# Altium PCB x-fly_v0.11a.PcbDoc (part 2 of 2)
Units mil, origin at the board's own origin, x right, y up, seen from the top; angles counter-clockwise.
Board outline 1417.32 x 1417.32 mil, 4 copper layers (L1_TOP, L2_GND, L3_POWER, L4_BOTTOM), stack 21.665 mil thick; 122 components, 92 nets, 493 pads, 97 vias.
Unrouted connection lines stored in the file: 100.
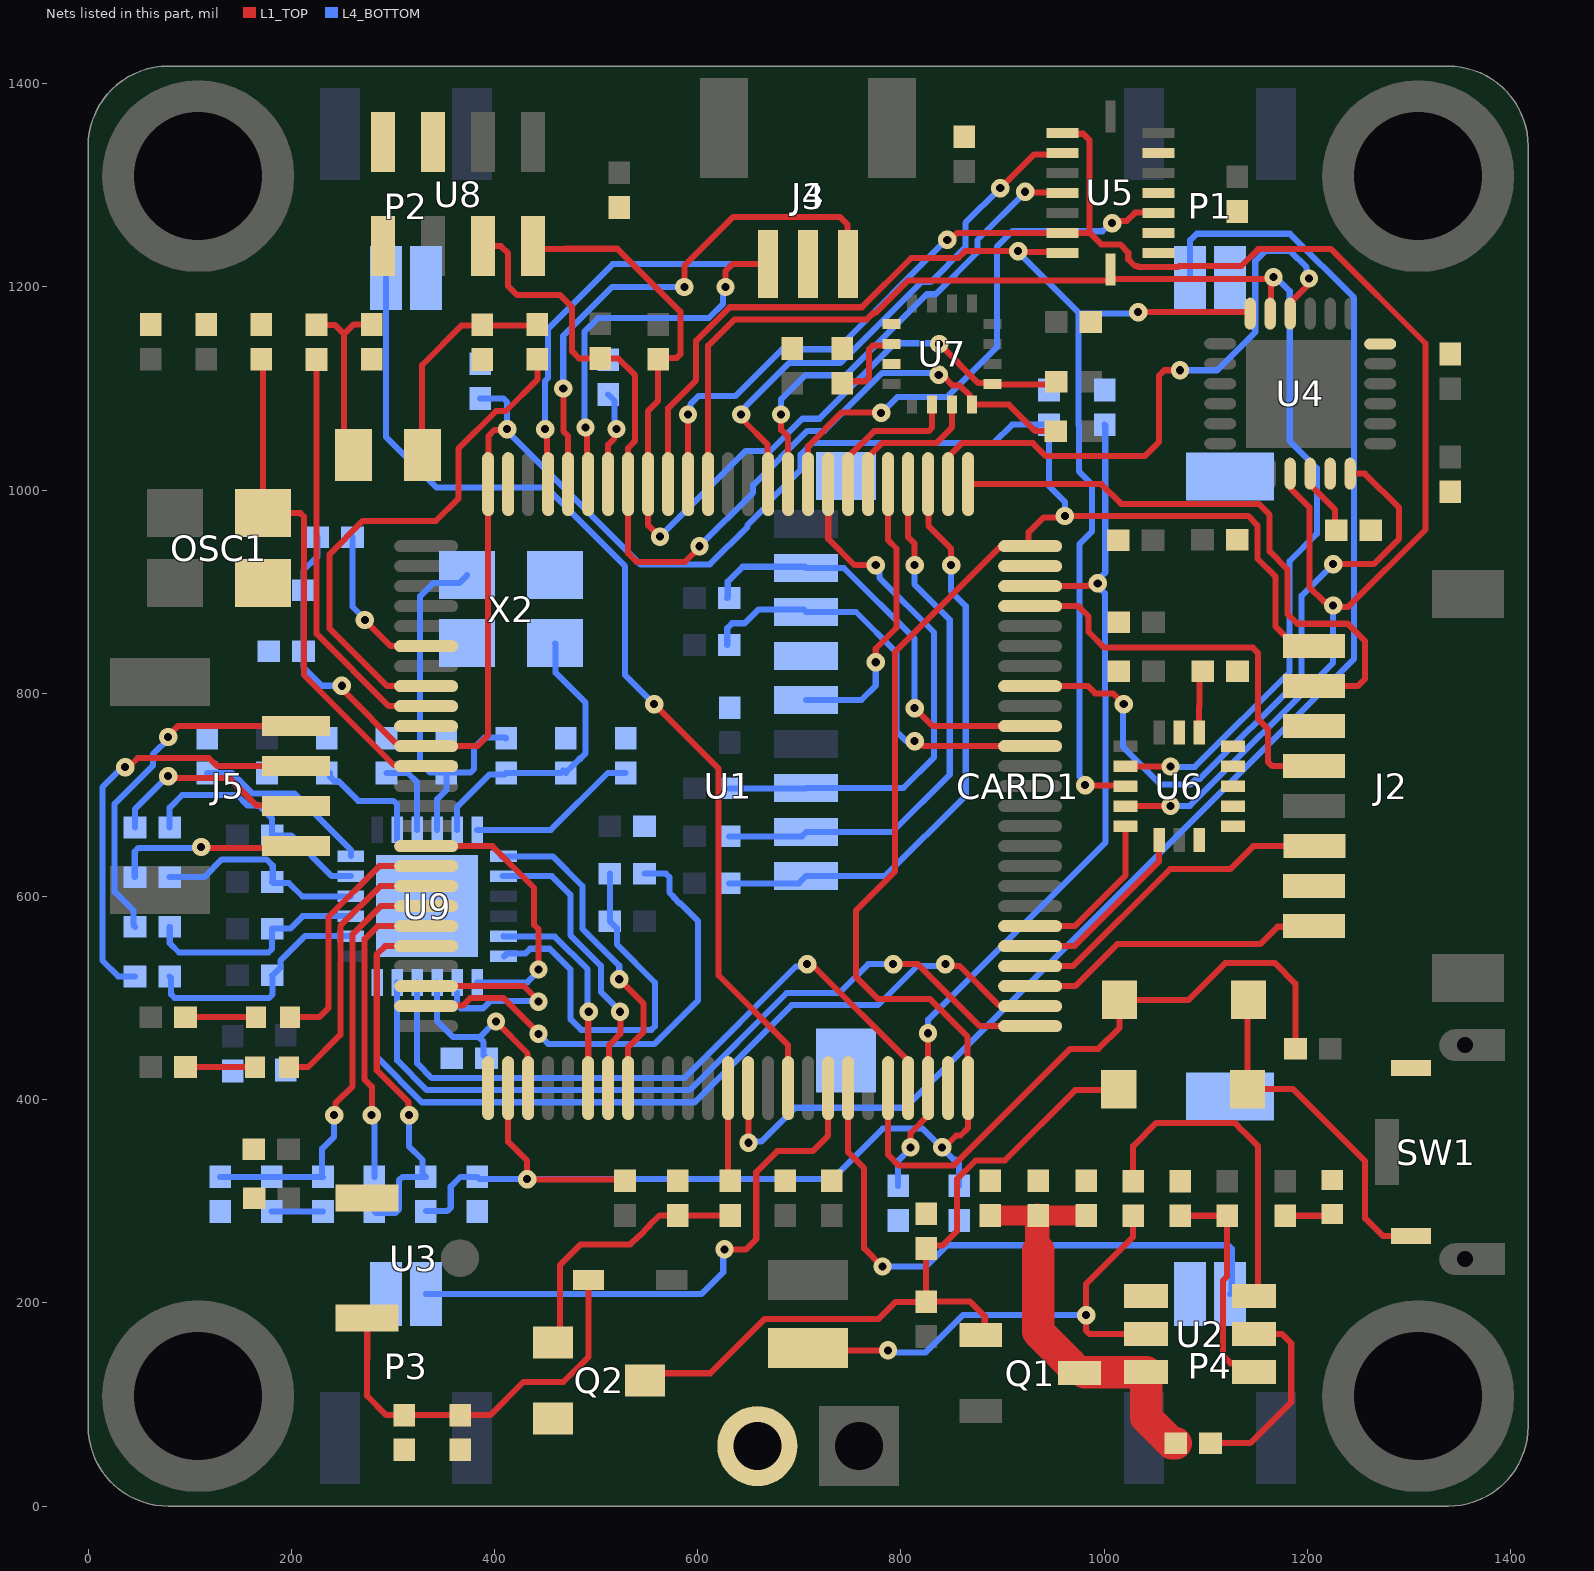
[diagram p4: the nets of this part, all layers, seen from the top]

## Via types
v1: diameter 18, hole 8, L1_TOP to L4_BOTTOM, tented both sides, 97 vias

## Nets (pads, with @x,y where several pads share a name; then routed paths per layer and width w, separated by ;. In a path a pad name is that pad's centre, name@x,y a point inside that pad or via, vN(x,y) a via of type N, cw(c..) or ccw(c..) an arc to the next point about the centre after c; other vN are vias at no path point) (continued)
BMI088_GYRO_INT: U1.85 U5.12 | length 455.9
  L1_TOP w6: v1(681.97,1074.59) 681.97,1059.4 688.98,1052.39 U1.85@688.98,1005.9 ; v1(922.24,1293.77) 922.85,1293.16 958.15,1293.16 U5.12@958.75,1292.56
  L4_BOTTOM w6: v1(681.97,1074.59) 681.97,1089.45 705.61,1113.09 745.67,1113.09 825.37,1192.8 834.07,1192.8 875.33,1234.06 875.33,1246.39 922.24,1293.31 v1(922.24,1293.77)
ETH_MDC: U1.16 U9.13 | length 272.1
  L1_TOP w6: U1.16@332.68,649.6 397.79,649.6 438.79,608.6 438.79,572.3 443.24,567.84 443.24,528.53 v1@443.49,528.29
  L4_BOTTOM w6: U9.13@382.87,515.45 432.35,515.47 443.24,526.36 v1(443.24,528.29)
ETH_MDIO: R32.2 U1.24 | length 466.8
  L1_TOP w6: U1.24@332.68,492.12 333.18,492.62 368.51,492.62 375.96,500.07 408.89,500.07 v1@443.45,465.51
  L4_BOTTOM w6: v1(443.24,464.92) 443.24,464.58 452.76,455.07 557.6,455.07 600.28,497.75 600.28,575.83 582.65,593.46 581.92,593.46 576.7,598.67 576.7,599.41 572.19,603.92 572.19,619.02 568.68,622.53 R32.2@547.54,622.53
ETH_RESET: R31.2 U1.28 U9.15 | length 210.7
  L1_TOP w6: v1@401.46,476.61 432.52,445.54 432.52,411.97 U1.28@433.07,411.42
  L4_BOTTOM w6: U9.15@343.5,515.45 343.5,477.36 359.12,461.74 384.59,461.74 389.27,457.06 389.27,443.72 R31.2@392.04,440.94 ; 385.08,461.25 400.9,477.08 v1(401.46,477.08)
FDCAN1_RX: J4.3 U1.95 | length 377.6
  L1_TOP w6: v1(489.41,1061.67) 491.01,1060.07 491.01,1007.01 U1.95@492.12,1005.9 ; v1@627.22,1199.33 627.22,1215.62 634.04,1222.44 J4.3@669.29,1222.44
  L4_BOTTOM w6: v1(489.41,1061.67) 488.34,1062.74 488.34,1155.91 501.9,1169.47 610.93,1169.47 624.92,1183.46 624.92,1197.03 v1@627.22,1199.33
  other v1: 627.22,1199.95
FDCAN1_TX: J4.1 U1.96 | length 530.9
  L1_TOP w6: v1(467.61,1100.11) 467.66,1100.06 467.66,1058.09 472.44,1053.31 U1.96@472.44,1005.9 ; v1(586.82,1199.95) 586.82,1220.68 635.09,1268.95 739.91,1268.95 747.47,1261.39 747.47,1223 J4.1@748.03,1222.44
  L4_BOTTOM w6: v1(467.61,1100.11) 467.61,1152.02 515.54,1199.95 v1(586.82,1199.95)
GND: C1.1 C4.1 C5.1 C6.1 C7.1 C8.1 C10.2 C11.2 C12.1 C13.1 C14.1 C15.2 C16.2 C17.2 C18.2 C19.1 C20.1 C21.1 C22.1 C23.1 C24.1 C25.1 C26.1 C27.2 C28.1 C29.2 C30.1 C31.1 C32.1 C33.2 C34.1 C35.1 C36.1 C37.1 C38.2 C39.2 C40.2 C41.2 C42.2 C43.2 C44.1 C45.1 C46.2 C47.2 C50.1 CARD1.6 CARD1.10 CARD1.11 CARD1.12 CARD1.13 J1.2 J2.2 J2.6 J3.3 J4.2 LED1.2 OSC1.2 P1.2 P2.2 P3.2 P4.2 Q2.2 R4.2 R7.1 R11.1 R17.1 R23.2 R24.1 R25.2 R31.1 SW1.1 U1.10 U1.26 U1.49 U1.74 U1.99 U2.1 U3.1 U4.11 U4.18 U5.2 U5.4 U5.6 U5.7 U6.8 U6.9 U6.10 U6.11 U6.12 U6.13 U6.15 U7.9 U7.11 U8.3 U8.4 U8.5 U9.25 X2.2 X2.4
I2C1_SCL: R19.1 R21.1 U1.92 U7.1 U8.8 | length 908
  L1_TOP w6: U8.8@437.99,1240.16 440.82,1237.32 469.31,1237.32 469.61,1237.62 520.86,1237.62 582.9,1175.59 582.9,1133.69 579.38,1130.18 562.18,1130.18 R21.1@561.02,1129.02 561.02,1087.84 551.18,1077.99 U1.92@551.18,1005.9 551.18,965.41 562.31,954.27 v1(562.77,954.27) ; v1(837.6,1143.91) 876.19,1105.32 889.17,1105.32 U7.1@890.22,1104.27 ; U7.1@890.42,1104.19 950.25,1104.19 R19.1@952.84,1106.78
  L4_BOTTOM w6: v1(562.77,954.27) 646.88,1038.39 671.1,1038.39 702.99,1070.27 719.68,1070.27 794.03,1144.62 836.89,1144.62 v1(837.6,1143.91)
I2C1_SDA: R20.1 R22.2 U1.93 U7.16 U8.7 | length 958.1
  L1_TOP w6: U8.7@388.78,1240.16 406.2,1240.16 413.39,1232.97 413.39,1200.84 422.19,1192.04 464.45,1192.04 476.28,1180.21 476.28,1136.63 483.3,1129.61 521.7,1129.61 538.39,1112.93 538.39,1048.43 531.49,1041.53 U1.93@531.49,1005.9 531.49,937.78 539.96,929.32 587.37,929.32 601.6,943.55 v1(601.6,944.78) ; v1(837.22,1113.48) 840.47,1113.48 851.11,1102.83 858.07,1102.83 868.16,1092.74 868.16,1086.42 870.39,1084.19 906.2,1084.19 932.31,1058.07 R20.1@951.94,1058.07
  L4_BOTTOM w6: v1(601.6,944.78) 654.39,997.57 654.39,1004.84 707.92,1058.37 724.61,1058.37 781.63,1115.38 835.31,1115.38 v1(837.22,1113.48)
ICM20602_INT: U1.55 U6.6 | length 182.7
  L1_TOP w6: U1.55@927.16,551.18 970.61,551.18 1054.13,634.7 U6.6@1054.13,655.8
ICM20689_INT: U1.68 U4.12 | length 668.7
  L1_TOP w6: U1.68@927.16,807.09 984.14,807.09 991.22,800.01 1008.69,800.01 v1(1019.33,789.37) ; v1(1225.39,927.17) 1265.31,927.17 1290.35,952.21 1290.35,982.58 1256.69,1016.24 U4.12@1242.13,1016.24
  L4_BOTTOM w6: v1(1019.33,789.37) 1018.47,788.51 1018.47,747.56 1055.84,710.19 1084.87,710.19 1090.46,715.77 1094.1,715.77 1194.33,816 1194.33,896.1 v1(1225.39,927.17)
IST8310_DRDY: U1.81 U7.15 | length 143.8
  L1_TOP w6: U1.81@767.72,1005.9 767.72,1032.76 781.27,1046.3 834.69,1046.3 850.4,1062.01 U7.15@850.4,1084.13
IST8310_RSTN: U1.82 U7.14 | length 143.9
  L1_TOP w6: U1.82@748.03,1005.9 748.03,1032.75 773.49,1058.21 827.2,1058.21 830.72,1061.72 U7.14@830.72,1084.13
LED1: LED2.1 U1.17 | length 248.3
  L1_TOP w6: LED2.1@198.45,481.3 227.43,481.3 236.41,490.28 236.41,579.91 286.42,629.92 U1.17@332.68,629.92
LED2: LED3.1 U1.18 | length 271.4
  L1_TOP w6: LED3.1@197.83,432.09 216.38,432.09 248.31,464.03 248.31,571.15 287.4,610.23 U1.18@332.68,610.23
NET_RX+: C51.2 R26.2 U9.23 | length 245.4
  L4_BOTTOM w6: C51.2@80.23,667.98 80.23,687.61 92.61,699.99 146.47,699.99 156.78,689.68 168,689.68 181.02,676.66 R26.2@181.02,660.3 ; R26.2@181.43,660.3 199.67,660.3 239.89,620.08 U9.23@258.56,620.08
NET_RX-: C52.2 R27.2 U9.22 | length 211
  L4_BOTTOM w6: C52.2@80.23,619.09 114.06,619.09 131.62,636.66 175.53,636.66 181.71,630.49 181.71,615.06 R27.2@181.02,614.37 182.01,613.37 197.64,613.37 210.94,600.07 U9.22@258.34,600.07
NET_TX+: C48.2 R28.2 U9.21 | length 224.7
  L4_BOTTOM w6: C48.2@80.25,570.19 80.25,554.09 89.39,544.95 177.5,544.95 181.02,548.47 R28.2@181.02,568.44 198.97,568.44 211.24,580.71 U9.21@258.56,580.71
NET_TX-: C49.2 R29.2 U9.20 | length 237.8
  L4_BOTTOM w6: C49.2@80.23,521.33 81.59,519.97 81.59,503.67 85.1,500.16 178.01,500.16 181.52,503.67 R29.2@181.52,522.51 ; U9.20@258.56,561.02 213.35,561.02 189.15,536.82 189.15,530.14 R29.2@181.52,522.51 ; R29.2@181.52,522.51 R29.2@181.02,522.51 R29.2@181.52,522.51
NetC1_2: C1.2 R2.1 X1.2 | length 219.1
  L1_TOP w6: X1.2@329.24,1034.45 328.65,1035.03 328.65,1123.22 367.69,1162.26 441.33,1162.26 R2.1@442.18,1163.1
NetC5_2: C5.2 R6.1 X1.1 | length 185.4
  L1_TOP w6: R6.1@224.76,1162.71 225.07,1162.4 243.11,1162.4 251.7,1153.81 251.7,1153.37 ; X1.1@261.32,1034.45 251.7,1044.06 251.7,1153.37 ; C5.2@279.13,1163.11 261.45,1163.11 251.7,1153.37
NetC7_2: C7.2 OSC1.3 U1.12 | length 499.4
  L1_TOP w6: C7.2@170.42,1121.16 172.25,1119.33 OSC1.3@172.25,977.36 208.93,977.36 212.45,973.85 212.45,818 300.99,729.45 331.57,729.45 U1.12@332.68,728.34
NetC8_2: C8.2 D1.1 Q1.1 Q2.3 R8.1 | length 722.2
  L1_TOP w6: Q2.3@548.23,123.91 555.12,130.79 612.29,130.79 665.6,184.1 777.68,184.1 794.67,201.1 R8.1@824.8,201.1 C8.2@824.79,253.63 ; C8.2@824.79,253.63 827.78,256.63 840.9,256.63 855.32,271.04 855.32,322.07 873.48,340.23 902.15,340.23 971.37,409.45 D1.1@1013.78,409.45 ; R8.1@825.1,201.39 868.12,201.39 882.44,187.07 Q1.1@882.44,172.63
NetC9_1: C9.1 U2.6 | length 325.4
  L1_TOP w6: C9.1@1028.54,319.91 1028.54,354.33 1051.39,377.17 1128.52,377.17 1136.6,369.09 1136.81,369.09 1151.22,354.68 1151.22,210.28 U2.6@1147.64,206.69
NetC9_2: C9.2 L1.2 U2.2 | length 484.4
  L1_TOP w6: L1.2@708.66,155.51 710.82,153.36 v1(787.31,153.36) ; C9.2@1028.54,285.83 1028.54,265.01 982.28,218.75 v1(982.28,187.99) 982.28,172.81 985.8,169.29 U2.2@1041.34,169.29
  L4_BOTTOM w6: v1(787.31,153.36) 789.53,151.13 824.1,151.13 860.96,187.99 v1(982.28,187.99) v1@983.27,187.99
NetC15_1: C15.1 C16.1 D3.2 U3.3 | length 394.7
  L1_TOP w6: U3.3@274.71,185.03 274.71,144.79 274.61,144.68 274.61,108.44 293.45,89.59 C15.1@311.02,89.59 C16.1@366.14,89.59 395.69,89.59 428.31,122.21 467.68,122.21 492.52,147.05 D3.2@492.52,215.55
NetC29_1: C29.1 U4.10 | length 69.9
  L1_TOP w6: U4.10@1202.76,1016.24 1202.76,1005.3 1227.36,980.7 C29.1@1227.36,956.48
NetC33_1: C33.1 U6.14 | length 61.8
  L1_TOP w6: U6.14@1093.5,761.52 1093.5,787.66 1093.69,787.86 1093.69,818.41 C33.1@1097.13,821.85
NetC39_1: C39.1 U7.10 | length 81
  L1_TOP w6: C39.1@742.13,1105.4 743.97,1107.25 765.07,1107.25 768.59,1110.76 768.59,1138.85 772.1,1142.36 789.49,1142.36 U7.10@790.83,1143.69
NetC42_1: C42.1 R30.2 U9.4 X2.3 | length 393.8
  L4_BOTTOM w6: U9.4@343.5,665.65 343.5,695.86 352.5,704.86 C42.1@352.5,721.63 351.93,722.19 336.38,722.19 326.77,731.8 326.77,895.61 339.98,908.82 365.51,908.82 X2.3@373.03,916.34 ; C42.1@352.5,722.13 376.4,722.13 379.91,725.65 379.91,746.42 389.92,756.43 410.59,756.43 R30.2@411.31,755.72
NetC45_2: C45.2 R30.1 U9.5 X2.1 | length 292.6
  L4_BOTTOM w6: U9.5@363.19,665.65 363.19,688.27 395.19,720.27 409.94,720.27 R30.1@411.31,721.64 ; R30.1@411.31,721.64 465.28,721.61 467.6,723.93 C45.2@469.42,722.61 ; X2.1@459.65,849.17 460.13,848.69 460.13,820.3 489.68,790.75 489.68,740.88 484.46,735.67 483.68,735.67 470.14,722.13 C45.2@470.14,721.63
NetC46_1: C46.1 U9.6 | length 169.3
  L4_BOTTOM w6: U9.6@382.87,665.65 455.49,665.65 511.46,721.63 C46.1@528.97,721.63
NetC48_1: C48.1 J5.1 | length 348.8
  L1_TOP w6: v1(78.74,757.02) 78.74,758.2 88.26,767.71 J5.1@204.73,767.71
  L4_BOTTOM w6: C48.1@46.15,570.21 44.56,571.8 44.56,586.32 26.11,604.78 26.11,691.19 63.77,728.86 63.77,740.04 v1@80.75,757.02
NetC49_1: C49.1 J5.2 | length 415.3
  L1_TOP w6: v1(36.42,727.36) 39.66,727.36 48.71,736.41 118.88,736.41 126.71,728.58 204.48,728.58 J5.2@204.73,728.34
  L4_BOTTOM w6: v1(36.42,727.36) 33.73,727.36 13.91,707.54 13.91,537.09 29.53,521.46 46.01,521.46 C49.1@46.15,521.33
NetC51_1: C51.1 J5.3 | length 202.5
  L1_TOP w6: v1(78.74,718.5) 80.57,716.68 138.64,716.68 165.78,689.54 204.16,689.54 J5.3@204.73,688.97
  L4_BOTTOM w6: C51.1@46.15,667.98 46.15,686.3 78.36,718.5 v1(78.74,718.5)
NetC52_1: C52.1 J5.4 | length 186.1
  L1_TOP w6: v1@111.22,647.64 202.76,647.64 J5.4@204.73,649.6
  L4_BOTTOM w6: C52.1@45.86,619.38 45.86,644.32 49.38,647.84 v1@111.22,647.84
  other v1: 111.22,648.84
NetD1_2: D1.2 D2.2 SW1.2 | length 342.1
  L1_TOP w6: D2.2@1141.97,498.39 1141.15,497.56 D1.2@1141.15,410.43 1185.92,410.43 1256.81,339.54 1256.81,283.43 1274.49,265.75 SW1.2@1302.17,265.75
NetLED1_1: LED1.1 R10.2 | length 47
  L1_TOP w6: R10.2@1178.06,285.82 1222.83,285.82 LED1.1@1224.41,287.4
NetLED2_2: LED2.2 R13.2 | length 69.2
  L1_TOP w6: R13.2@95.78,481.3 LED2.2@164.99,481.3
NetLED3_2: LED3.2 R14.2 | length 68.6
  L1_TOP w6: R14.2@95.78,432.22 164.24,432.22 LED3.2@164.37,432.09
NetQ2_1: Q2.1 R11.2 R12.2 | length 260.4
  L1_TOP w6: Q2.1@457.68,168.31 458.49,168.31 464.24,174.05 464.24,237.14 484.73,257.63 533.76,257.63 542.18,266.06 542.67,266.06 552.44,275.84 552.44,276.32 562.22,286.1 R12.2@632.06,286.1
NetR2_2: R2.2 U1.8 | length 508.6
  L1_TOP w6: U1.8@332.68,807.09 294.35,807.09 237.33,864.11 237.33,936.65 270.37,969.69 342.33,969.69 364.34,991.71 364.34,1040.63 401.66,1077.94 411.23,1077.94 442.18,1108.89 R2.2@442.18,1121.15
NetR4_1: R4.1 U1.94 | length 95
  L1_TOP w6: U1.94@511.81,1005.9 511.81,1044.67 517.64,1050.49 517.64,1057.86 v1(519.93,1060.16)
  L4_BOTTOM w6: R4.1@511.81,1094.18 518.03,1087.96 518.03,1062.06 v1(519.93,1060.16)
NetR6_2: R6.2 U1.9 | length 399.6
  L1_TOP w6: R6.2@224.76,1120.76 224.76,858.49 295.85,787.4 U1.9@332.68,787.4
NetR15_1: R15.1 U2.5 | length 194.4
  L1_TOP w6: R15.1@1104.64,62.01 1143.7,62.01 1184.16,102.47 1184.16,160.33 1175.2,169.29 U2.5@1147.64,169.29
NetR16_2: R16.2 R17.2 U2.4 | length 213.9
  L1_TOP w6: R17.2@1074.8,285.82 R16.2@1112.16,285.82 ; R16.2@1121.02,285.82 1121.02,226.13 1117.08,222.19 1117.08,148.16 1124.53,140.7 1138.83,140.7 U2.4@1147.64,131.89
NetR23_1: R23.1 U9.2 | length 115.9
  L4_BOTTOM w6: R23.1@238.17,721.77 238.17,717.79 242.46,713.5 246.44,713.5 265.78,694.16 300.5,694.16 304.01,690.65 304.01,665.77 U9.2@304.13,665.65 U9.2@304.13,655.81
NetR24_2: R24.2 U9.24 | length 178.9
  L4_BOTTOM w6: R24.2@117.19,721.64 141.66,721.64 161.71,701.59 202.94,701.59 258.56,645.97 U9.24@258.56,639.76
NetR25_1: R25.1 U9.3 | length 80.8
  L4_BOTTOM w6: R25.1@293.66,721.64 314.72,721.64 323.82,712.53 U9.3@323.82,665.65
NetR32_1: R32.1 R33.1 U9.12 | length 383.8
  L4_BOTTOM w6: U9.12@409.15,540.96 412.05,543.85 430.22,543.85 435.01,548.65 454.29,548.65 474.76,528.18 474.76,479.25 485.25,468.76 554.39,468.76 557.91,472.28 557.91,515.31 520.35,552.87 520.35,568.9 R33.1@513.47,575.79 R32.1@513.46,622.53
POWER_HOLD: R12.1 U1.38 | length 92.1
  L1_TOP w6: U1.38@629.92,411.42 629.92,322.32 R12.1@632.06,320.18
RMII_CRS_DV: U1.31 U9.11 | length 213.7
  L1_TOP w6: U1.31@492.15,411.45 492.15,486.15 v1(492.67,486.67)
  L4_BOTTOM w6: U9.11@408.76,561.02 409.23,560.55 459.22,560.55 491.53,528.25 491.53,487.98 v1@492.67,486.84
RMII_REF_CLK: U1.23 U9.14 | length 213.6
  L1_TOP w6: U1.23@332.68,511.81 332.85,511.98 428.8,511.98 443.24,497.54 v1@443.24,497.06
  L4_BOTTOM w6: U9.14@363.19,505.61 363.19,493.56 366.71,490.04 388.66,490.04 395.68,497.06 v1@443.24,497.06
  other v1: 443.24,496.6
RMII_RXD0: U1.32 U9.8 | length 289.9
  L1_TOP w6: U1.32@511.81,411.42 512.8,412.41 512.8,453.82 523.86,464.89 v1@523.86,486.67
  L4_BOTTOM w6: U9.8@407.95,620.08 456.41,620.08 474.6,601.89 474.6,562.01 504.68,531.93 504.68,506.12 523.4,487.4 v1(523.4,486.67)
RMII_RXD1: U1.33 U9.7 | length 322.1
  L1_TOP w6: v1(522.68,518.58) 546.69,494.57 546.69,466.88 531.49,451.68 U1.33@531.49,411.42
  L4_BOTTOM w6: U9.7@406.74,639.59 457.34,639.59 486.5,610.43 486.5,568.31 522.68,532.13 v1(522.68,518.58)
RMII_TX_EN: U1.47 U9.16 | length 681.5
  L1_TOP w6: v1(707.68,533.46) 709.97,531.17 714.19,531.17 807.09,438.27 U1.47@807.09,411.42
  L4_BOTTOM w6: U9.16@323.82,515.45 323.82,435.96 338.37,421.41 586.76,421.41 696.52,531.17 705.38,531.17 v1(707.68,533.46)
RMII_TXD0: U1.51 U9.17 | length 788.4
  L1_TOP w6: v1(792.32,533.46) 816.58,533.46 877.61,472.44 U1.51@927.16,472.44
  L4_BOTTOM w6: U9.17@304.13,515.45 304.13,438.82 333.44,409.5 591.9,409.5 687.51,505.11 739.27,505.11 767.62,533.46 v1(792.32,533.46)
RMII_TXD1: U1.52 U9.18 | length 806.7
  L1_TOP w6: v1@843.69,531.68 857.66,531.68 896.11,493.23 926.05,493.23 U1.52@927.16,492.12
  L4_BOTTOM w6: U9.18@284.45,515.45 284.45,441.66 328.51,397.6 596.83,397.6 692.44,493.2 777.39,493.2 815.86,531.68 v1@843.69,531.68
  other v1: 843.69,533.46
SBUS_IN: J3.1 U1.97 | length 398.3
  L1_TOP w6: v1(449.76,1060.04) 451.64,1058.16 451.64,1007.01 U1.97@452.75,1005.9
  L4_BOTTOM w6: v1(449.76,1060.04) 449.71,1060.09 449.71,1107.52 452.53,1110.35 452.53,1158.61 516.36,1222.44 J3.1@669.3,1222.44
SDMMC_CK: CARD1.5 U1.80 | length 284.5
  L1_TOP w6: v1(775.21,830.59) 775.21,844.17 795.58,864.55 795.58,942.61 787.4,950.79 U1.80@787.4,1005.9
  L4_BOTTOM w6: CARD1.5@706.69,793.48 761.11,793.48 775.21,807.57 v1(775.21,830.59)
SDMMC_CMD: CARD1.3 R36.1 U1.83 | length 540
  L1_TOP w6: U1.83@728.41,1005.85 728.41,952.05 754.28,926.18 v1@777.56,926.18
  L4_BOTTOM w6: R36.1@630.82,706.5 706.33,706.5 CARD1.3@706.69,706.86 802.33,706.86 832.64,737.17 832.64,859.9 778.69,913.85 778.69,925.05 v1@777.56,926.18
  other v1: 775.21,926.18
SDMMC_D0: CARD1.7 R37.1 U1.65 | length 415
  L1_TOP w6: v1(813.48,752.95) 816.73,752.95 821.65,748.03 U1.65@927.16,748.03
  L4_BOTTOM w6: R37.1@629.04,847.64 629.04,864.3 633.74,869 646.09,869 659.59,882.5 704.27,882.5 CARD1.7@706.69,880.08 755.75,880.08 795.46,840.36 795.46,762.61 804.75,753.32 v1@804.75,752.95
SDMMC_D1: CARD1.8 R38.1 U1.66 | length 425.1
  L1_TOP w6: v1(813.48,785.43) 831.2,767.72 U1.66@927.16,767.72
  L4_BOTTOM w6: R38.1@629.04,893.9 629.51,894.36 629.51,910.01 644.14,924.65 705.43,924.65 CARD1.8@706.69,923.39 743.9,923.39 813.48,853.8 v1(813.48,785.43)
SDMMC_D2: CARD1.1 R34.1 U1.78 | length 590.1
  L1_TOP w6: U1.78@826.91,1005.76 826.91,965.05 849.41,942.55 v1(849.41,926.18)
  L4_BOTTOM w6: R34.1@630.82,612.99 699.41,612.99 CARD1.1@706.69,620.28 784.65,620.28 863.72,699.35 863.72,885.95 849.07,900.6 v1@849.07,925.84
SDMMC_D3: CARD1.2 R35.1 U1.79 | length 545.1
  L1_TOP w6: U1.79@807.09,1005.9 807.09,953.8 813.48,947.4 v1(813.48,926.18)
  L4_BOTTOM w6: R35.1@630.82,659.25 702.38,659.25 CARD1.2@706.69,663.57 791.52,663.57 847.98,720.03 847.98,872.49 813.48,906.99 v1(813.48,926.18)
SPI3_CS1: U1.86 U5.14 | length 518.7
  L1_TOP w6: v1@642.72,1070.87 643.19,1070.87 645.01,1069.04 645.01,1068.57 668.69,1044.89 668.69,1006.5 U1.86@669.29,1005.9 ; v1(897.66,1297.26) 930.96,1330.57 957.39,1330.57 U5.14@958.75,1331.93
  L4_BOTTOM w6: v1@642.72,1070.87 645.01,1073.16 645.01,1080.39 648.78,1084.16 689.62,1125 740.17,1125 819.87,1204.7 829.13,1204.7 863.42,1238.99 863.42,1263.03 v1(897.66,1297.26)
  other v1: 642.72,1074.59
SPI3_CS2: U1.84 U5.5 | length 535.8
  L1_TOP w6: U1.84@708.66,1005.9 708.66,1043.45 741.81,1076.6 780.02,1076.6 v1(780.51,1076.11) ; v1(1007.87,1262.8) 1010.17,1265.09 1022.31,1265.09 1030.46,1273.24 1052.86,1273.24 U5.5@1053.23,1272.87
  L4_BOTTOM w6: v1(780.51,1076.11) 781.05,1076.11 796.67,1091.74 845.52,1091.74 894.43,1140.65 894.43,1239.64 909.65,1254.85 998.36,1254.85 1006.3,1262.8 v1(1007.87,1262.8)
SPI3_CS3: U1.56 U6.5 | length 163.1
  L1_TOP w6: U1.56@927.16,570.86 971.25,570.86 1020.96,620.57 U6.5@1020.96,669.29
SPI3_CS4: U1.77 U4.22 | length 614
  L1_TOP w6: U1.77@846.46,1005.9 846.46,1032.76 860.01,1046.3 929.86,1046.3 942.66,1033.5 1040.07,1033.5 1054.12,1047.55 1054.12,1112.86 1059.3,1118.05 v1(1074.57,1118.05) ; U4.22@1183.08,1173.72 1183.08,1184.66 1199.22,1200.8 1199.22,1206.11 v1(1201.52,1208.41)
  L4_BOTTOM w6: v1(1074.57,1118.05) 1111.16,1118.05 1148.66,1155.55 1148.66,1225.44 1158.46,1235.24 1183.18,1235.24 1199.22,1219.19 1199.22,1210.71 v1(1201.52,1208.41)
SPI3_MISO: U1.90 U4.9 U5.10 U5.15 U6.4 | length 1833.5
  L1_TOP w6: U1.90@590.55,1005.9 v1@590.55,1074.38 ; v1(845.52,1246.41) 848.76,1246.41 855.54,1253.19 U5.10@958.75,1253.19 983.41,1253.19 984.61,1254.39 ; U5.15@958.75,1351.61 959.54,1350.82 979.36,1350.82 985.58,1344.6 985.58,1255.36 984.61,1254.39 ; U6.4@1020.96,688.97 1064.88,688.97 v1(1065.19,689.28) ; U4.9@1183.08,1016.24 1184.04,1015.28 1184.04,1000.99 1202.07,982.97 1202.07,904.55 1216.07,890.54 1218.01,890.54 1222.15,886.41 v1(1225.39,886.41) 1226.9,884.9 1239.88,884.9 1316.25,961.27 1316.25,1144.38 1223.43,1237.2 1151.57,1237.2 1135.04,1220.67 1073.67,1220.67 1072.67,1219.67 1033.8,1219.67 1032.8,1220.67 1030.15,1220.67 1023.68,1227.14 1023.68,1233.83 1015.61,1241.9 997.1,1241.9 984.61,1254.39
  L4_BOTTOM w6: v1(590.35,1074.59) 592.65,1076.88 592.65,1084.59 600.68,1092.62 636.91,1092.62 682.98,1138.69 737.02,1138.69 844.74,1246.41 v1(845.52,1246.41) ; v1(1065.19,689.28) 1084.45,689.28 1225.39,830.23 v1(1225.39,886.41)
SPI3_MOSI: U1.91 U4.24 U5.9 U6.3 | length 1323.4
  L1_TOP w6: U1.91@570.86,1005.9 570.86,1080.84 598.34,1108.31 598.34,1147.12 631.29,1180.07 761.56,1180.07 809.99,1228.5 856.53,1228.5 863.27,1235.24 v1(915.35,1235.24) 916.22,1234.37 957.88,1234.37 U5.9@958.75,1233.5 ; v1(981.3,709.65) 981.79,709.15 1020.47,709.15 U6.3@1020.96,708.66 ; v1(1033.46,1175.2) 1141.94,1175.2 U4.24@1143.71,1173.43
  L4_BOTTOM w6: v1(915.35,1235.24) 915.35,1233.98 974.88,1174.46 974.88,1173.91 ; v1(981.3,709.65) 981.3,712.89 975.76,718.43 975.76,947.11 987.94,959.29 987.94,1005.94 975.18,1018.7 975.18,1063.42 974.88,1063.73 974.88,1173.91 ; v1(1033.46,1175.2) 1032.17,1173.91 974.88,1173.91
SPI3_SCK: U1.89 U4.23 U5.8 U6.2 | length 1380.5
  L1_TOP w6: U1.89@610.24,1005.9 610.24,1142.18 636.22,1168.16 766.49,1168.16 772.54,1174.21 774.61,1174.21 806.95,1206.55 1004.07,1206.55 1005.99,1208.47 U5.8@1005.99,1217.25 ; U5.8@1007.92,1207.76 v1@1164.69,1207.76 ; U6.2@1021.64,727.66 1022.07,728.09 v1(1065.19,728.09) ; U4.23@1163.39,1173.72 1164.35,1174.68 1164.35,1207.43 v1@1164.69,1207.76 ; v1(1166.57,1209.65) v1@1164.69,1207.76
  L4_BOTTOM w6: v1@1065.61,727.68 1089.17,727.68 1182.42,820.93 1182.42,930.07 1209.37,957.02 1209.37,1021.59 1182.62,1048.34 1182.62,1196 1168.98,1209.65 v1(1166.57,1209.65)
SW_STATUS: D2.1 R9.1 U1.46 | length 642.1
  L1_TOP w6: U1.46@787.4,411.42 787.4,345.74 797.88,335.26 851.67,335.26 966.42,450.01 994.3,450.01 1015.19,470.9 D2.1@1015.19,498.39 1083.03,498.39 1119.09,534.45 1168.18,534.45 1188.26,514.36 R9.1@1188.26,450.06
SWCLK: J2.7 U1.76 | length 591.7
  L1_TOP w6: U1.76@866.14,1005.9 997.27,1005.9 1016.66,986.51 1151.94,986.51 1162.75,975.7 1162.75,939.74 1180.41,922.08 1180.41,878.38 1190.28,868.51 1239.76,868.51 1256.87,851.4 1256.87,814.21 1249.76,807.1 J2.7@1206.72,807.1
SWDIO: J2.5 U1.72 | length 410.7
  L1_TOP w6: U1.72@927.16,885.83 974.58,885.83 984.56,875.85 984.56,860.66 1000.25,844.98 1146.29,844.98 1151.57,839.69 1151.57,774.61 1161.42,764.76 1161.42,732.43 1165.49,728.36 J2.5@1206.72,728.36
TIM1_CH1: P1.1 U1.39 | length 1429.9
  L1_TOP w6: U1.39@649.61,411.42 649.82,411.21 649.82,357.97 v1(650.03,357.76)
  L4_BOTTOM w6: v1(650.03,357.76) 651.1,358.84 662.41,358.84 695.77,392.19 804.19,392.19 1246.06,834.06 1246.06,1189.19 1182.83,1252.42 1091.11,1252.42 1084.64,1245.95 P1.1@1084.64,1208.66
TIM1_CH2: P2.1 U1.41 | length 1024.4
  L1_TOP w6: v1(557.09,789.37) 620.44,726.02 620.44,522.3 688.98,453.76 U1.41@688.98,411.42
  L4_BOTTOM w6: P2.1@293.3,1208.66 293.3,1052.17 342.78,1002.69 450.82,1002.69 528.56,924.95 528.56,817.89 v1(557.09,789.37)
TIM1_CH3: P3.1 U1.43 | length 558.4
  L1_TOP w6: v1(626.23,252.8) 626.49,252.55 647.23,252.55 657.57,262.88 657.57,328.83 678.15,349.41 713.01,349.41 728.35,364.75 U1.43@728.35,411.42
  L4_BOTTOM w6: P3.1@332.68,208.66 603.55,208.66 625.1,230.21 625.1,251.67 v1(626.23,252.8)
TIM1_CH4: P4.1 U1.44 | length 588.8
  L1_TOP w6: U1.44@748.03,411.42 748.03,348.17 763.7,332.5 763.7,253.89 v1(781.75,235.84)
  L4_BOTTOM w6: v1(781.75,235.84) 824.36,235.84 845.36,256.85 1122.02,256.85 1125.53,253.33 1125.53,210.17 P4.1@1124.02,208.66
USART1_RX: J2.3 U1.54 | length 328.6
  L1_TOP w6: U1.54@927.16,531.49 969.18,531.49 1064.77,627.08 1124.16,627.08 1146.68,649.61 J2.3@1206.82,649.61
USART1_TX: J2.1 U1.53 | length 304
  L1_TOP w6: U1.53@927.16,511.81 971.46,511.81 1012.8,553.15 1153.54,553.15 1170.72,570.32 1206.17,570.32 J2.1@1206.72,570.87
VBAT: R1.2 U1.6 | length 157.6
  L1_TOP w6: v1(272.34,872.14) 298.02,846.47 U1.6@332.68,846.46
  L4_BOTTOM w6: R1.2@260.15,953.74 260.15,885.41 272.34,873.22 v1(272.34,872.14)
VCAP: C19.2 C26.2 U1.48 U1.73 | length 904.8
  L1_TOP w6: v1(809.38,353.17) 809.38,367.18 826.77,384.57 U1.48@826.77,411.42 826.72,411.47 826.72,465.41 v1(826.67,465.45) ; U1.73@927.16,905.51 983.73,905.51 984.2,905.98 991.41,905.98 v1(993.7,908.27)
  L4_BOTTOM w6: C19.2@797.24,315.27 797.24,340.05 809.38,352.18 v1(809.38,353.17) ; v1(826.67,465.45) 826.78,465.56 826.78,478.81 1001.42,653.45 1001.42,799.76 1000.66,800.52 1000.66,898.76 993.7,905.72 v1(993.7,908.27) ; v1@993.7,911.52 1001.08,918.9 1001.08,1063.8 C26.2@1000.42,1064.46
VDD_MCU: C20.2 C21.2 C22.2 C23.2 C24.2 C25.2 J2.8 R1.1 R3.1 R18.1 U1.11 U1.27 U1.50 U1.75 U1.100 | length 3428.7
  L1_TOP w6: v1(249.67,807.51) 251.97,805.21 251.97,801.9 305.83,748.03 U1.11@332.68,748.03 383.08,748.03 393.7,758.65 U1.100@393.7,1005.9 394.06,1006.26 394.06,1053.51 399.77,1059.22 408.63,1059.22 v1@410.11,1060.7 ; U1.27@413.38,411.42 413.38,358.61 432.09,339.91 v1(432.09,321.85) ; v1@432.59,321.35 R18.1@528.35,321.35 ; v1(840.55,353.17) 842.67,353.17 854.34,364.84 858.58,364.84 866.14,372.4 U1.50@866.14,411.42 ; U1.50@865.67,432.28 865.67,462.08 828.74,499.02 777.56,499.02 755.56,521.01 755.56,586.27 794.29,625 794.29,840.8 901.33,947.83 U1.75@924.21,947.83 ; U1.75@927.16,944.88 925.62,946.42 925.62,958.54 940.09,973.02 959.68,973.02 v1(961.27,974.61) 1141.61,974.61 1150.84,965.37 1150.84,932.74 1168.5,915.08 1168.5,865.98 1188.01,846.47 J2.8@1206.72,846.47
  L4_BOTTOM w6: R1.1@225.57,953.74 225.57,934.67 211.92,921.02 C25.2@211.92,901.57 C20.2@211.92,841.54 211.98,841.48 211.98,825.42 229.89,807.51 v1(249.67,807.51) ; R3.1@332.63,290.4 353.32,290.4 356.84,293.91 356.84,314.51 366.45,324.13 C21.2@382.87,324.13 385.15,321.85 v1(432.09,321.85) 732.28,321.85 782.01,371.58 821.33,371.58 839.74,353.17 v1(840.55,353.17) ; C24.2@385.83,1090.24 408.89,1090.24 412.4,1086.73 412.4,1057.95 543.47,926.88 611.87,926.88 649.13,964.14 649.13,965.91 666.29,983.07 666.29,985.25 701.21,1020.17 701.21,1034.83 712.85,1046.46 729.55,1046.46 891.34,1046.46 909.34,1064.46 C23.2@945.64,1064.46 945.64,1004.16 961.27,988.53 v1(961.27,974.61) ; v1@840.15,352.77 851.73,341.18 853.77,341.18 857.28,337.67 C22.2@857.28,315.27
  other v1: 412.4,1060.04
VDDA_MCU: C2.2 C3.2 R3.2 R5.2 U1.21 | length 424.4
  L1_TOP w6: v1(315.94,384.84) 315.39,385.4 315.39,397.74 284.03,429.1 284.03,543.03 292.19,551.18 U1.21@332.68,551.18
  L4_BOTTOM w6: C3.2@180.52,290.05 C2.2@231.11,290.05 ; R5.2@281.68,290.04 283.33,288.39 302.39,288.39 305.91,291.9 305.91,320.6 309.42,324.12 R3.2@332.27,324.12 329.11,327.28 329.11,340.74 315.94,353.9 v1(315.94,384.84)
VREF_MCU: R5.1 U1.20 | length 303.9
  L1_TOP w6: v1(279.04,384.84) 279.26,385.06 279.26,412.78 272.13,419.91 272.13,558.06 284.93,570.86 U1.20@332.68,570.86
  L4_BOTTOM w6: v1(279.04,384.84) 279.04,381.6 281.67,378.96 R5.1@281.68,324.12
VSSA_MCU: C2.1 C3.1 R7.2 U1.19 | length 436.7
  L1_TOP w6: v1(242.13,384.84) 243.56,386.27 243.56,396.87 260.22,413.53 260.22,562.99 287.78,590.55 U1.19@332.68,590.55
  L4_BOTTOM w6: R7.2@129.92,324.12 C3.1@180.52,324.13 C2.1@231.11,324.13 230.32,324.92 230.32,351.77 242.13,363.59 v1(242.13,384.84)
VSYS: C12.2 C13.2 C14.2 Q1.3 R15.2 U2.3 | length 404.2
  L1_TOP w20: C12.2@887.8,286.11 934.06,286.11 C13.2@935.04,286.11 C14.2@982.28,286.11
  L1_TOP w24: 934.06,252.95 C13.2@934.06,286.11
  L1_TOP w32: 935.04,251.97 935.04,171.66 966.54,140.16 966.54,139.28 Q1.3@970.73,135.09 ; Q1.3@980.85,131.89 U2.3@1041.34,131.89 1041.34,87.11 1066.44,62.01 R15.2@1070.56,62.01
pads on no net: CARD1.9 J2.9 J2.10 J3.4 J3.5 J4.4 J4.5 J5.5 J5.6 P1.3 P1.4 P2.3 P2.4 P3.3 P3.4 P4.3 P4.4 SW1.3 SW1.4 U1.1 U1.2 U1.3 U1.4 U1.5 U1.7 U1.13 U1.14 U1.15 U1.22 U1.25 U1.29 U1.30 U1.34 U1.35 U1.36 U1.37 U1.40 U1.42 U1.45 U1.57 U1.58 U1.59 U1.60 U1.61 U1.62 U1.63 U1.64 U1.67 U1.69 U1.70 U1.71 U1.87 U1.98 U4.1 U4.2 U4.3 U4.4 U4.5 U4.6 U4.7 U4.14 U4.15 U4.16 U4.17 U4.19 U4.20 U4.21 U4.25 U5.1 U5.13 U6.7 U7.3 U7.4 U7.5 U7.6 U7.7 U7.8 U7.12 U8.6 U9.10

## Polygon pours and split planes (outlines as drawn)
no net on L4_BOTTOM "NONET_L04_P002" (solid, pour order 2): 1417.32,1417.32 0,1417.32 0,0 1417.32,0
GND on L1_TOP "GND_L01_P000" (solid, pour order 0): 1417.32,1417.32 0,1417.32 0,0 1417.32,0
no net on L2_GND (split plane): 78.74,1397.23 1338.58,1397.23 1339.16,1397.28 1345.16,1396.95 1351.65,1395.84 1357.98,1394.02 1364.07,1391.5 1369.83,1388.31 1375.2,1384.5 1380.11,1380.11 1384.5,1375.2 1388.31,1369.83 1391.5,1364.07 1394.02,1357.98 1395.84,1351.65 1396.95,1345.16 1397.28,1339.16 1397.23,1338.58 1397.23,78.74 1397.28,78.16 1396.95,72.16 1395.84,65.67 1394.02,59.34 1391.5,53.26 1388.31,47.49 1384.5,42.12 1380.11,37.21 1375.2,32.82 1369.83,29.01 1364.07,25.82 1357.98,23.3 1351.65,21.48 1345.16,20.38 1339.16,20.04 1338.58,20.1 78.74,20.1 78.16,20.04 72.16,20.38 65.67,21.48 59.34,23.3 53.26,25.82 47.49,29.01 42.12,32.82 37.21,37.21 32.82,42.12 29.01,47.49 25.82,53.26 23.3,59.34 21.48,65.67 20.38,72.16 20.04,78.16 20.1,78.74 20.1,1338.58 20.04,1339.16 20.38,1345.16 21.48,1351.65 23.3,1357.98 25.82,1364.07 29.01,1369.83 32.82,1375.2 37.21,1380.11 42.12,1384.5 47.49,1388.31 53.26,1391.5 59.34,1394.02 65.67,1395.84 72.16,1396.95 78.16,1397.28
+BAT_3S on L3_POWER (split plane): 906.39,189.68 906.39,20.1 711.72,20.1 711.72,106.3 711.72,188.69 721.74,198.71 897.36,198.71
VSYS on L3_POWER (split plane): 1182.48,200.01 1182.48,20.1 912.51,20.1 912.51,190.94 912.27,192.12 911.61,193.11 900.78,203.93 899.79,204.6 898.62,204.83 853.45,204.83 853.45,275.31 877.25,299.11 1083.38,299.11
5V on L3_POWER (split plane): 1311.9,712.32 1311.9,602.64 1300.9,591.64 1172.24,591.64 1171.07,591.41 1170.08,590.75 1158.27,578.93 1157.61,577.94 1157.37,576.77 1157.37,314.26 1148.34,305.22 875.98,305.22 874.81,304.99 873.82,304.33 848.23,278.74 847.57,277.75 847.33,276.57 847.33,204.83 720.47,204.83 719.3,204.6 718.31,203.93 706.5,192.12 705.84,191.13 705.6,189.96 705.6,106.3 705.6,20.1 432.19,20.1 432.19,188.69 569.18,325.68 864.17,325.68 865.34,325.91 866.34,326.58 987.4,447.64 988.06,448.63 988.3,449.8 988.3,542.04 1175.48,729.22 1294.99,729.22
3V3 on L3_POWER (split plane): 78.74,1397.23 1338.58,1397.23 1339.16,1397.28 1345.16,1396.95 1351.65,1395.84 1357.98,1394.02 1364.07,1391.5 1369.83,1388.31 1375.2,1384.5 1380.11,1380.11 1384.5,1375.2 1388.31,1369.83 1391.5,1364.07 1394.02,1357.98 1395.84,1351.65 1396.95,1345.16 1397.28,1339.16 1397.23,1338.58 1397.23,78.74 1397.28,78.16 1396.95,72.16 1395.84,65.67 1394.02,59.34 1391.5,53.26 1388.31,47.49 1384.5,42.12 1380.11,37.21 1375.2,32.82 1369.83,29.01 1364.07,25.82 1357.98,23.3 1351.65,21.48 1345.16,20.38 1339.16,20.04 1338.58,20.1 1188.6,20.1 1188.6,201.27 1188.36,202.45 1187.7,203.44 1092.03,299.11 1149.61,299.11 1150.78,299.34 1151.77,300 1162.6,310.83 1163.26,311.82 1163.49,312.99 1163.49,575.5 1173.51,585.52 1302.17,585.52 1303.34,585.76 1304.33,586.42 1317.12,599.21 1317.79,600.21 1318.02,601.38 1318.02,713.58 1317.79,714.75 1317.12,715.75 1298.42,734.45 1297.43,735.11 1296.26,735.34 1174.21,735.34 1173.04,735.11 1172.05,734.45 983.07,545.47 982.41,544.48 982.18,543.31 982.18,451.07 862.91,331.8 567.91,331.8 566.74,331.57 565.75,330.9 426.97,192.12 426.31,191.13 426.08,189.96 426.08,20.1 78.74,20.1 78.16,20.04 72.16,20.38 65.67,21.48 59.34,23.3 53.26,25.82 47.49,29.01 42.12,32.82 37.21,37.21 32.82,42.12 29.01,47.49 25.82,53.26 23.3,59.34 21.48,65.67 20.38,72.16 20.04,78.16 20.1,78.74 20.1,1338.58 20.04,1339.16 20.38,1345.16 21.48,1351.65 23.3,1357.98 25.82,1364.07 29.01,1369.83 32.82,1375.2 37.21,1380.11 42.12,1384.5 47.49,1388.31 53.26,1391.5 59.34,1394.02 65.67,1395.84 72.16,1396.95 78.16,1397.28

## Keep-outs
Keep-Out Layer:
  the board outline again, w10

## Other copper
L3_POWER (plane layer: these items are gaps in the copper):
  lines w6: 429.13,0 429.13,189.96 567.91,328.74 844.49,328.74 864.17,328.74 985.24,449.8 985.24,543.31 1174.21,732.28 1296.26,732.28 1314.96,713.58 1314.96,601.38 1302.17,588.58 1172.24,588.58 1160.43,576.77 1160.43,312.99 1149.61,302.17 1084.65,302.17 ; 708.66,2.95 708.66,106.3 708.66,189.96 720.47,201.77 898.62,201.77 909.45,190.94 909.45,8.86 915.35,2.95 ; 850.39,201.77 850.39,276.57 875.98,302.17 1084.65,302.17 ; 1185.54,2.95 1185.54,201.27 1084.65,302.17

## Silkscreen, mask and mechanical layers (free items; w line width, h text height)
Top Overlay:
  lines w10: 980.32,595.94 1062.86,595.94 ; 1036.09,622.71 1062.86,595.94 ; 1037.59,570.67 1062.86,595.94
  text "X" at 1082.83,580.87 h29.53